# Altium PCB Layout.PcbDoc
Units mm, origin at the board's own origin, x right, y up, seen from the top; angles counter-clockwise.
Board outline 72.5 x 42.54 mm, 2 copper layers (Top Layer, Bottom Layer), stack 1.135 mm thick; 7 components, 3 nets, 9 pads, 0 vias.
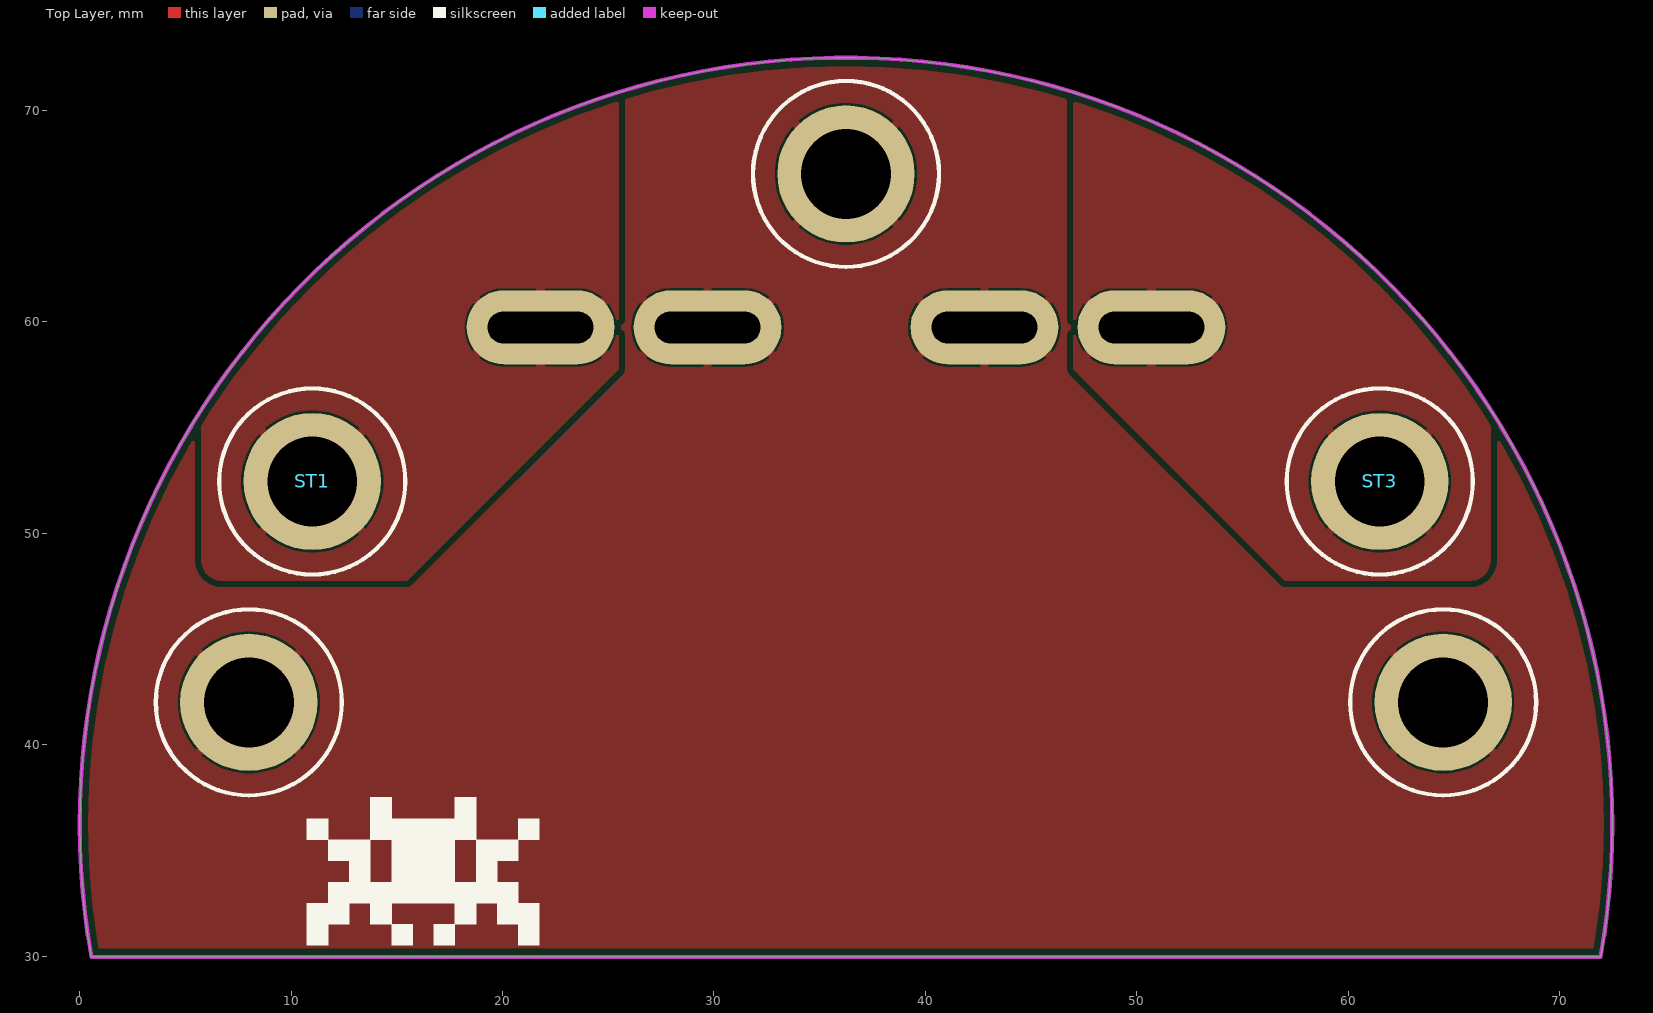
[diagram p0: Top Layer view]
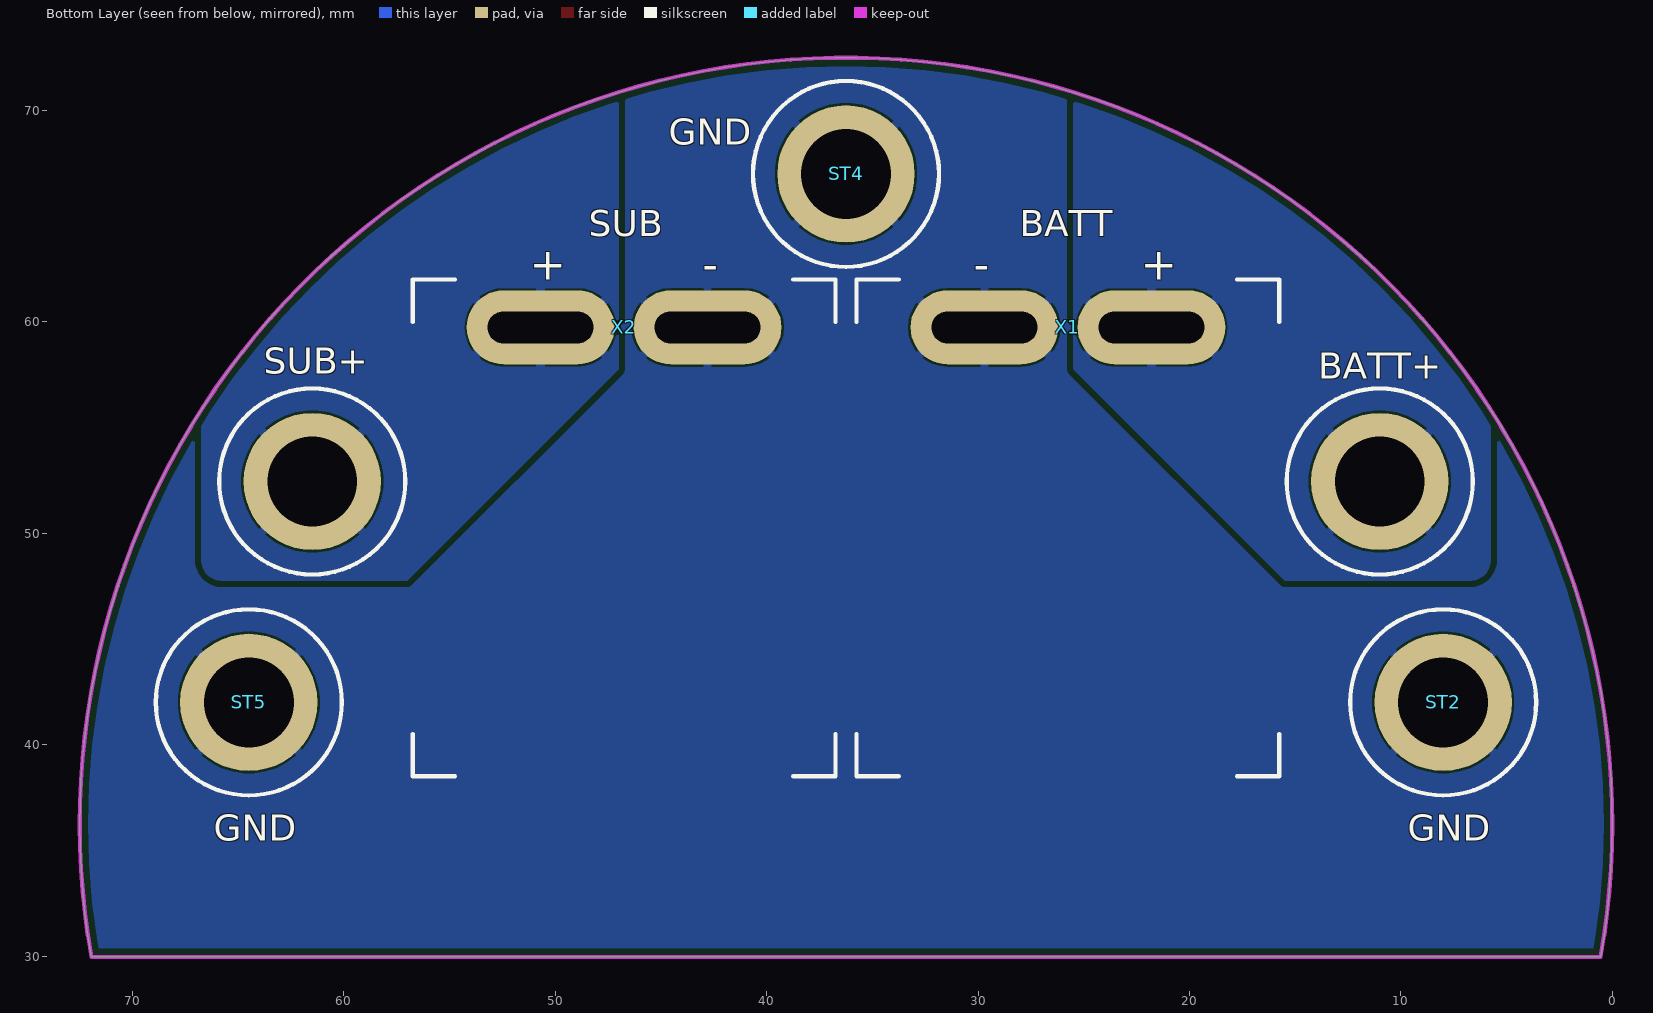
[diagram p1: Bottom Layer view, seen from below]

## Layer stack, top to bottom
Top Solder: solder mask 0.0102, Solder Resist, Dk 3.8
Top Layer: signal copper 0.035
Dielectric 1: dielectric 1.065, FR-4, Dk 4.8
Bottom Layer: signal copper 0.035
Bottom Solder: solder mask 0.0102, Solder Resist, Dk 3.8

## Board outline
0.551,29.955 cw(c36.25,36.25) 71.949,29.955 71.949,29.959

## Design rules (kind name [scope] priority, off if disabled: settings)
BoardOutlineClearance [All] p1: gap=0.2 ignorepadtopadclearanceinfootprint=FALSE
Clearance "inPolygon Clearance" [InPolygon] p1: gap=0.3 ignorepadtopadclearanceinfootprint=TRUE // this rule ensures that every net within a polygon of a different net has a set clearance from the poly
Clearance "High Current Polygon Clearance" [(InPolygon AND InNetClass('High_Current_Nets'))] p2: gap=0 ignorepadtopadclearanceinfootprint=TRUE // this rule ensures that every net within a polygon of a different net has a set clearance from the poly
Clearance "Different Diff Pair" [All] p3: gap=0.2 ignorepadtopadclearanceinfootprint=TRUE
Clearance "Same Diff Pair" [All] p4: gap=0.1 ignorepadtopadclearanceinfootprint=TRUE
Clearance "Different Nets" [not InAnyDifferentialPair] p5: gap=0.3 ignorepadtopadclearanceinfootprint=TRUE except(0.1: Arc-SMDPad Arc-THPad Arc-Via Arc-Text Track-SMDPad Track-THPad Track-Via Track-Text SMDPad-Text THPad-Text Via-Text Fill-Text Poly-Text Region-Text Text-Text; 0.12: Arc-Arc Arc-Track Track-Track; 0.15: SMDPad-SMDPad SMDPad-THPad SMDPad-Via THPad-THPad THPad-Via Via-Via; 0.2: Arc-Hole Track-Hole SMDPad-Hole THPad-Hole Via-Hole Fill-Hole Poly-Hole Region-Hole Text-Hole)
Clearance "Same Net" [not InAnyDifferentialPair] p6: gap=0 ignorepadtopadclearanceinfootprint=TRUE except(0.1: THPad-Via; 0.18: Arc-Arc Arc-Track Track-Track)
ComponentClearance [All] p1: gap=0.102 collisioncheckmode=3 verticalgap=0.102 showdistances=TRUE
DiffPairsRouting "Ethernet Routing" [InDifferentialPairClass('Ethernet_Pairs')] p1: maxlimit=0.2 minlimit=0.2 mostfreqgap=0.2 toplayer_minwidth=0.25 toplayer_maxwidth=0.25 toplayer_prefwidth=0.25 bottomlayer_minwidth=0.25 bottomlayer_maxwidth=0.25 bottomlayer_prefwidth=0.25 impedanceprofiledriven=TRUE maxuncoupledlength=12.7
DiffPairsRouting "USB Routing" [InDifferentialPairClass('USB_Pairs')] p2: maxlimit=0.127 minlimit=0.127 mostfreqgap=0.127 toplayer_minwidth=0.23 toplayer_maxwidth=0.23 toplayer_prefwidth=0.23 bottomlayer_minwidth=0.23 bottomlayer_maxwidth=0.23 bottomlayer_prefwidth=0.23 maxuncoupledlength=12.7
DiffPairsRouting "CAN Routing" [InDifferentialPairClass('CAN_Pairs')] p3: maxlimit=0.5 minlimit=0.5 mostfreqgap=0.5 toplayer_minwidth=0.201 toplayer_maxwidth=0.201 toplayer_prefwidth=0.201 bottomlayer_minwidth=0.201 bottomlayer_maxwidth=0.201 bottomlayer_prefwidth=0.201 impedanceprofiledriven=TRUE maxuncoupledlength=12.7
Height [All] p1: minheight=0 maxheight=1816.048 prefheight=12.7
HoleSize [All] p1: absolutevalues=TRUE maxlimit=6.3 minlimit=0.3 maxpercent=80.000 minpercent=20.000
HoleToHoleClearance [All] p1: gap=0.25 allowstackedmicrovias=FALSE
MatchedLengths "XTAL Nets Matched Delays" [InNetClass('XTAL_Nets')] p1: tolerance=25.4 checknetsindiffpair=FALSE checkdiffpairvsdiffpair=TRUE checkxsignals=TRUE checkothers=TRUE usedelayunits=TRUE delaytolerance=10.000000
MatchedLengths "Diff Pair Matched Delays" [InDifferentialPairClass('Ethernet_Pairs') or InDifferentialPairClass('USB_Pairs') or InDifferentialPairClass('CAN_Pairs')] p2: tolerance=5 checknetsindiffpair=TRUE checkdiffpairvsdiffpair=FALSE checkxsignals=FALSE checkothers=FALSE usedelayunits=TRUE delaytolerance=100.000000 phasematching=TRUE phasedelaytolerance=5.000000 phasedistance=12.7
MinimumAnnularRing [All] p1: minimumring=0.2
MinimumSolderMaskSliver [All] p1: minsoldermaskwidth=0
PlaneClearance "Supply Net Clearance" [InNetClass('Supply_Nets')] p1: clearance=0.5
PlaneClearance "All Nets" [All] p2: clearance=0.3
PolygonConnect "High Current" [InNetClass('High_Current_Nets')] p1: thpad.connectstyle=Relief thpad.reliefconductorwidth=0.4 thpad.reliefentries=4 thpad.polygonreliefangle="90 Angle" thpad.airgapwidth=0.1 thpad.conductorbypadedge=TRUE thpad.mindistance=0.381 thpad.enablemindistance=FALSE smdpad.connectstyle=Direct smdpad.reliefconductorwidth=0.254 smdpad.reliefentries=4 smdpad.polygonreliefangle="90 Angle" smdpad.airgapwidth=0.254 via.connectstyle=Direct via.reliefconductorwidth=0.254 via.reliefentries=4 via.polygonreliefangle="90 Angle" via.airgapwidth=0.254
PolygonConnect "Supply Nets" [InNetClass('Supply_Nets') OR InNetClass('Supply_Net')] p2: connectstyle=Relief reliefconductorwidth=0.3 reliefentries=4 polygonreliefangle="90 Angle" conductorbypadedge=TRUE mindistance=0.381 enablemindistance=FALSE airgapwidth=0.254
PolygonConnect General [All] p3: connectstyle=Relief reliefconductorwidth=0.254 reliefentries=4 polygonreliefangle="90 Angle" airgapwidth=0.254
RoutingVias [All] p1: holewidth=0.2 width=0.35 viastyle="Through Hole" minholewidth=0.15 minwidth=0.3 maxholewidth=6.3 maxwidth=6.55
SilkToSilkClearance [All] p1: silktosilkclearance=0
SilkToSolderMaskClearance [All] p1: minsilkscreentomaskgap=0 clearancetoexposedcopper=TRUE
SolderMaskExpansion [All] p1: expansion=0.075 istentingtop=FALSE
SupplyNets "Schematic Supply Nets" [InNet('BATT Switched')] p1: voltage=0.000
SupplyNets "Schematic Supply Nets_2" [InNet('BATTERY IN')] p2: voltage=0.000
SupplyNets "Schematic Supply Nets_3" [InNet('GND')] p3: voltage=0.000
UnRoutedNet [All] p1: checkbadconnections=TRUE
Width "nRF Width" [InNetClass('nRF Signal')] p1: maxlimit=0.379 minlimit=0.379 preferedwidth=0.379 minimp=50.000000 maximp=50.000000 favimp=50.000000 checkconnectedcopper=TRUE
Width [All] p2: maxlimit=100 minlimit=0.1 preferedwidth=0.2
20 further rules are at their usual default settings.

## Classes and differential pairs
net class High_Current_Nets: "BATT Switched" "BATTERY IN" GND

## Components (designator, comment, footprint, x,y, rotation, side; value= is the part's Value field where it differs from the comment)
ST1 "M4 5mm" "[Standoff] M4 5mm" 11,52.45 r0 top
ST2 "M4 x 3.2mm" "[Bolt] M4 Nut h=3.2mm" 8,42 r180 bottom
ST3 "M4 5mm" "[Standoff] M4 5mm" 61.5,52.45 r0 top
ST4 "M4 x 3.2mm" "[Bolt] M4 Nut h=3.2mm" 36.25,67 r180 bottom
ST5 "M4 x 3.2mm" "[Bolt] M4 Nut h=3.2mm" 64.5,42 r180 bottom
X1 "Anderson 2pos Right-Angle" "[Anderson] 2pos Right-Angle w/o MH 1327G17" 25.75,41.5 r180 bottom
X2 "Anderson 2pos Right-Angle" "[Anderson] 2pos Right-Angle w/o MH 1327G17" 46.75,41.5 r180 bottom

## Footprints (in the part's own frame and the unit in brackets; to place one, negate y for a bottom-side part, rotate by r counter-clockwise, add the part's x,y. Pads: shape width x height; smd on the part's side, far side on the other; paste and mask are expansions set on the pad)
"[Anderson] 2pos Right-Angle w/o MH 1327G17" [mm]
  oval 7x3.5 hole 1.5 slot 5 at 0 deg: 1(3.95,18.24) 2(-3.95,18.24)
  silkscreen extent -10,-3 10,20.5, body extent -8.15,-10.51 8.15,18.24, height 8.64
"[Bolt] M4 Nut h=3.2mm" [mm] "90591A255"
  round 6.5 hole 4.25: 1(0,0)
  silkscreen extent -4.4,-4.4 4.4,4.4, body extent -3.5,-4.03 3.5,4.03, height 3.2
"[Standoff] M4 5mm" [mm] "971050474"
  round 6.5 hole 4.25: 1(0,0)
  silkscreen extent -4.4,-4.4 4.4,4.4, body extent -3.5,-4.04 3.5,4.04, height 5.25

## Part data
ST1 ST3: library part "[Standoff] M4 5mm", "971050474", Supplier Part Number 1=732-12900-ND, Supplier 1=DigiKey, System=Connector
ST2 ST4 ST5: library part "[Bolt] M4 Nut h=3.2mm", "90591A255", System=Connector
X1 X2: library part "[Anderson] 2pos Right-Angle w/o MH"

## Nets (pads, with @x,y where several pads share a name; then routed paths per layer and width w, separated by ;. In a path a pad name is that pad's centre, name@x,y a point inside that pad or via, vN(x,y) a via of type N, cw(c..) or ccw(c..) an arc to the next point about the centre after c; other vN are vias at no path point)
"BATT Switched": ST3.1 X2.2
"BATTERY IN": ST1.1 X1.1
GND: ST2.1 ST4.1 ST5.1 X1.2 X2.1

## Polygon pours and split planes (outlines as drawn)
"BATT Switched" on Top Layer "BATT OUT Bottom Poly" (solid, remove dead copper, pour order 23): 66.75,72 47,72 47,57.75 57,47.75 65.75,47.75 ccw(c65.75,48.75) 66.75,48.75
"BATTERY IN" on Top Layer "BATT IN BottomPoly" (solid, remove dead copper, pour order 22): 5.75,72 25.5,72 25.5,57.75 15.5,47.75 6.75,47.75 cw(c6.75,48.75) 5.75,48.75
GND on Top Layer "Top GND Poly" (solid, remove dead copper, pour order 24): 0,30 0,72.5 72.5,72.5 72.5,30
GND on Bottom Layer "Bottom GND Poly" (solid, remove dead copper, pour order 27): 0,30 0,72.5 72.5,72.5 72.5,30
"BATT Switched" on Bottom Layer "BATT OUT Bottom Poly" (solid, remove dead copper, pour order 26): 66.75,72 47,72 47,57.75 57,47.75 65.75,47.75 ccw(c65.75,48.75) 66.75,48.75
"BATTERY IN" on Bottom Layer "BATT IN BottomPoly" (solid, remove dead copper, pour order 25): 5.75,72 25.5,72 25.5,57.75 15.5,47.75 6.75,47.75 cw(c6.75,48.75) 5.75,48.75
GND on Top Solder "GND Top Solder" (solid): 27.25,72.5 45.25,72.5 45.25,57 55.75,46.5 69.25,46.5 69.25,37.5 3.25,37.5 3.25,46.5 16.75,46.5 27.25,57
"BATT Switched" on Top Solder "Batt Out Top Solder" (solid, pour order 31): 48.5,61.75 48.5,58 58,48.5 64.75,48.5 ccw(c64.75,49.5) 65.75,49.5 65.75,55 58,62.75 49.5,62.75 ccw(c49.5,61.75)
"BATTERY IN" on Top Solder "Batt IN Top Solder" (solid, pour order 32): 24,61.75 24,58 14.5,48.5 7.75,48.5 cw(c7.75,49.5) 6.75,49.5 6.75,55 14.5,62.75 23,62.75 cw(c23,61.75)
"BATT Switched" on Top Paste "Batt Out Top Paste" (solid, pour order 28): 48.5,61.75 48.5,58 58,48.5 64.75,48.5 ccw(c64.75,49.5) 65.75,49.5 65.75,55 58,62.75 49.5,62.75 ccw(c49.5,61.75)
"BATTERY IN" on Top Paste "Batt IN Top Paste" (solid, pour order 29): 24,61.75 24,58 14.5,48.5 7.75,48.5 cw(c7.75,49.5) 6.75,49.5 6.75,55 14.5,62.75 23,62.75 cw(c23,61.75)
GND on Top Paste "GND Top Paste" (solid, pour order 30): 3.25,37.5 69.25,37.5 69.25,46.5 53,46.5 45.25,54.25 45.25,72.75 27.25,72.75 27.25,54.25 19.5,46.5 3.25,46.5

## Keep-outs
Keep-Out Layer:
  lines w0.2: 71.949,29.955 ccw(c36.25,36.25) 0.551,29.955 71.949,29.959

## Silkscreen, mask and mechanical layers (free items; w line width, h text height)
Top Overlay:
  region: 10.75,36.22 10.75,36.5 11.749,36.5 11.749,36.499 11.75,36.499 11.75,35.5 10.75,35.5 10.75,36.218
  region: 20.75,35.808 20.75,36.499 20.751,36.499 20.751,36.5 21.75,36.5 21.75,35.5 20.75,35.5 20.75,35.807
  region: 17.75,31.42 17.75,30.5 16.75,30.5 16.75,31.499 16.751,31.499 16.751,31.5 17.75,31.5 17.75,31.422
  region: 15.124,30.5 14.75,30.5 14.75,31.5 15.749,31.5 15.749,31.499 15.75,31.499 15.75,30.5 15.125,30.5
  region: 13.768,37.5 14.75,37.5 14.75,36.5 17.75,36.5 17.75,37.5 18.75,37.5 18.75,35.5 17.75,35.5 17.75,33.5 18.75,33.5 18.75,35.5 20.75,35.5 20.75,34.501 20.749,34.501 20.749,34.5 19.75,34.5 19.75,33.5 20.749,33.5 20.749,33.499 20.75,33.499 20.75,32.5 21.75,32.5 21.75,30.5 20.75,30.5 20.75,31.5 19.751,31.5 19.751,31.501 19.75,31.501 19.75,32.5 18.75,32.5 18.75,31.501 18.749,31.501 18.749,31.5 17.75,31.5 17.75,32.5 14.75,32.5 14.75,31.5 13.751,31.5 13.751,31.501 13.75,31.501 13.75,32.5 12.75,32.5 12.75,31.501 12.749,31.501 12.749,31.5 11.75,31.5 11.75,30.5 10.75,30.5 10.75,32.5 11.75,32.5 11.75,33.499 11.751,33.499 11.751,33.5 12.75,33.5 12.75,34.5 11.751,34.5 11.751,34.501 11.75,34.501 11.75,35.5 13.75,35.5 13.75,33.5 14.75,33.5 14.75,35.5 13.75,35.5 13.75,37.5 13.766,37.5
Bottom Overlay:
  text "GND" at 44.632,68.375 h1.25
  text "BATT" at 28.041,64.05 h1.25
  text "SUB" at 48.416,64.05 h1.25
  text "+" at 22.3,62 h1.5
  text "-" at 30.2,62 h1.5
  text "-" at 42.3,62 h1.5
  text "+" at 51.2,62 h1.5
  text "SUB+" at 63.791,57.55 h1.25
  text "BATT+" at 13.916,57.3 h1.25
  text "GND" at 9.666,35.45 h1.25
  text "GND" at 66.166,35.45 h1.25
Poly Planning:
  lines w0.1: 5.75,48.75 ccw(c6.75,48.75) 6.75,47.75 ; 24.5,62 cw(c24.5,61) 25.5,61 ; 3.25,37.5 69.25,37.5 69.25,46.5 55.75,46.5 45.25,57 45.25,72.5 27.25,72.5 27.25,57 16.75,46.5 3.25,46.5 3.25,37.5 ; 5.75,47.75 5.75,62 25.5,62 25.5,57.75 15.5,47.75 5.75,47.75